# Altium PCB PCB_MACETA.PcbDoc
Units mil, origin at the board's own origin, x right, y up, seen from the top; angles counter-clockwise.
Board outline 2644 x 1425 mil, 2 copper layers (Top Layer, Bottom Layer); 33 components, 22 nets, 122 pads, 124 vias.
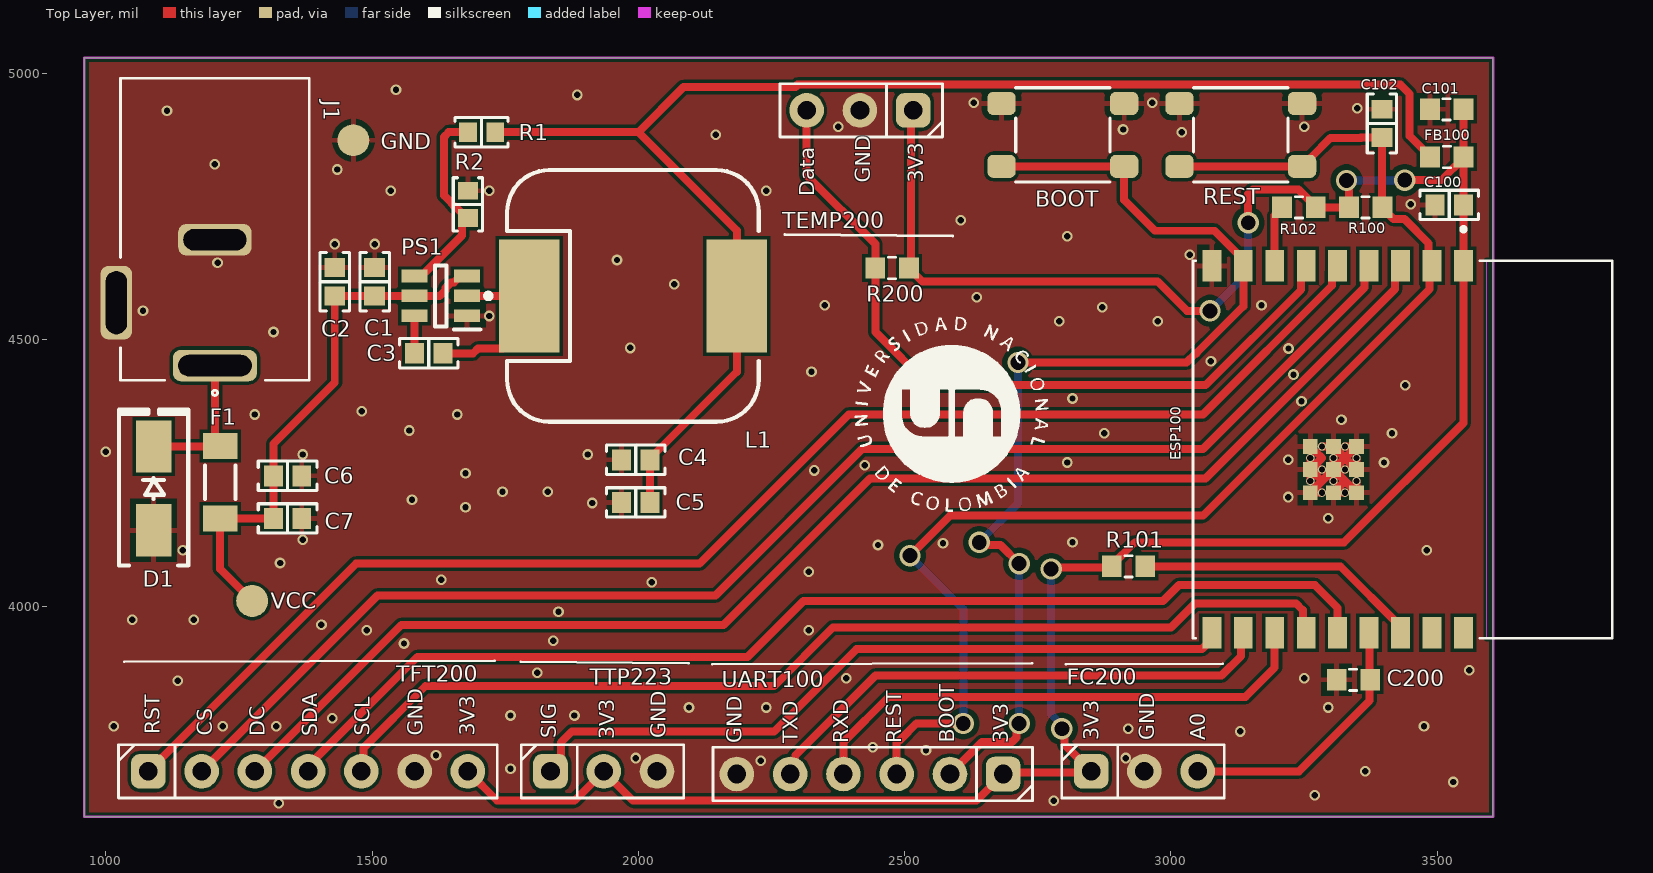
[diagram p0: Top Layer view]
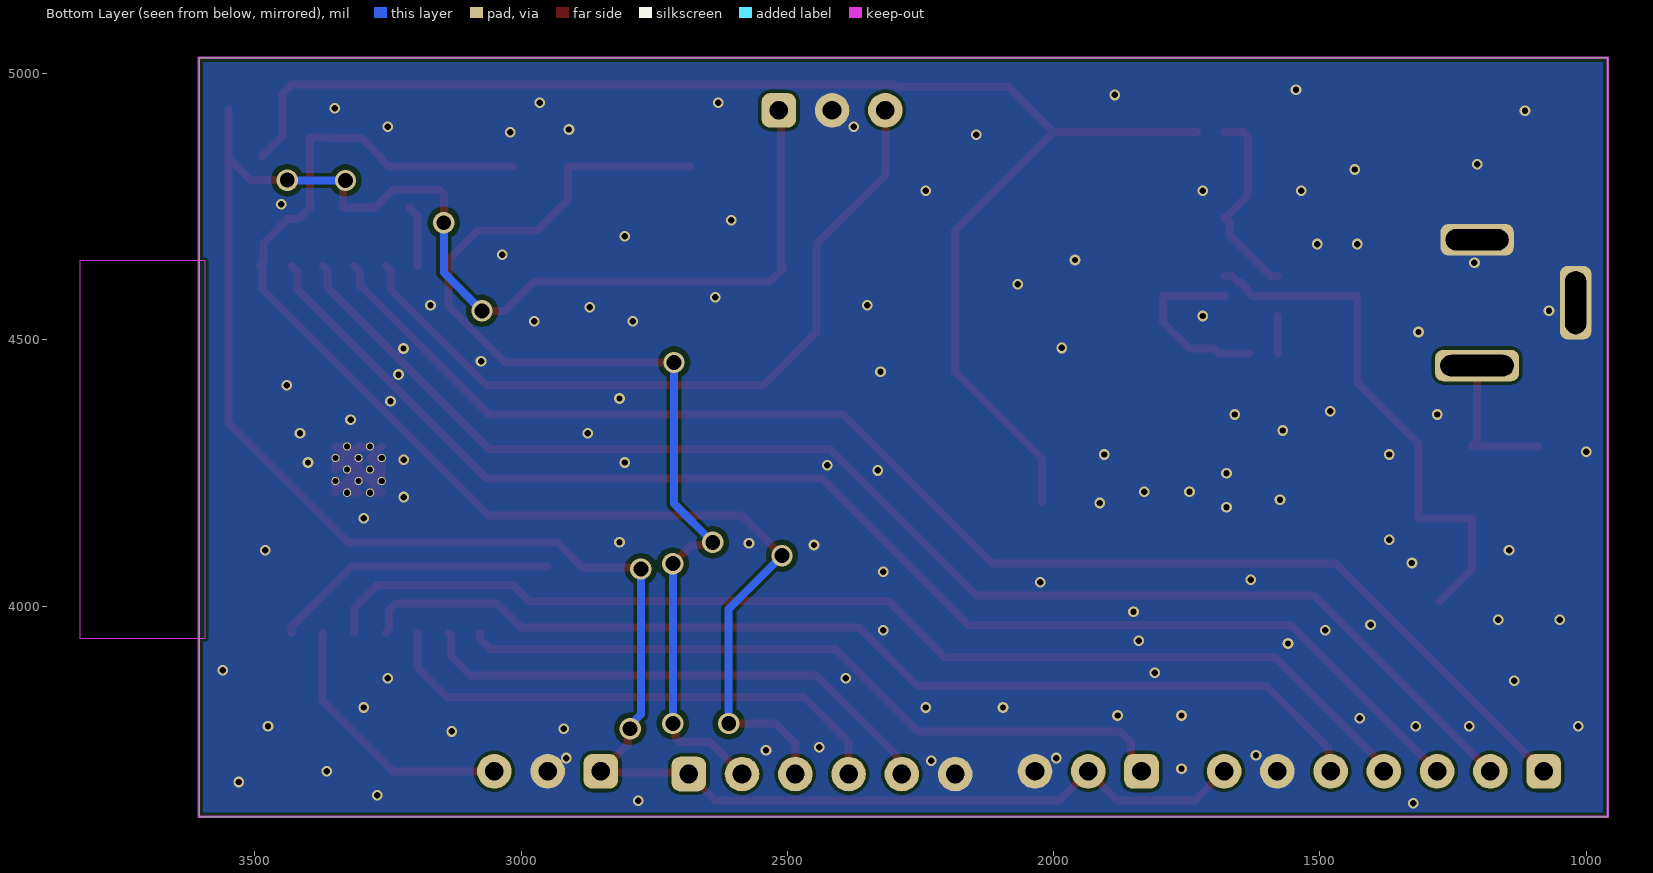
[diagram p1: Bottom Layer view, seen from below]
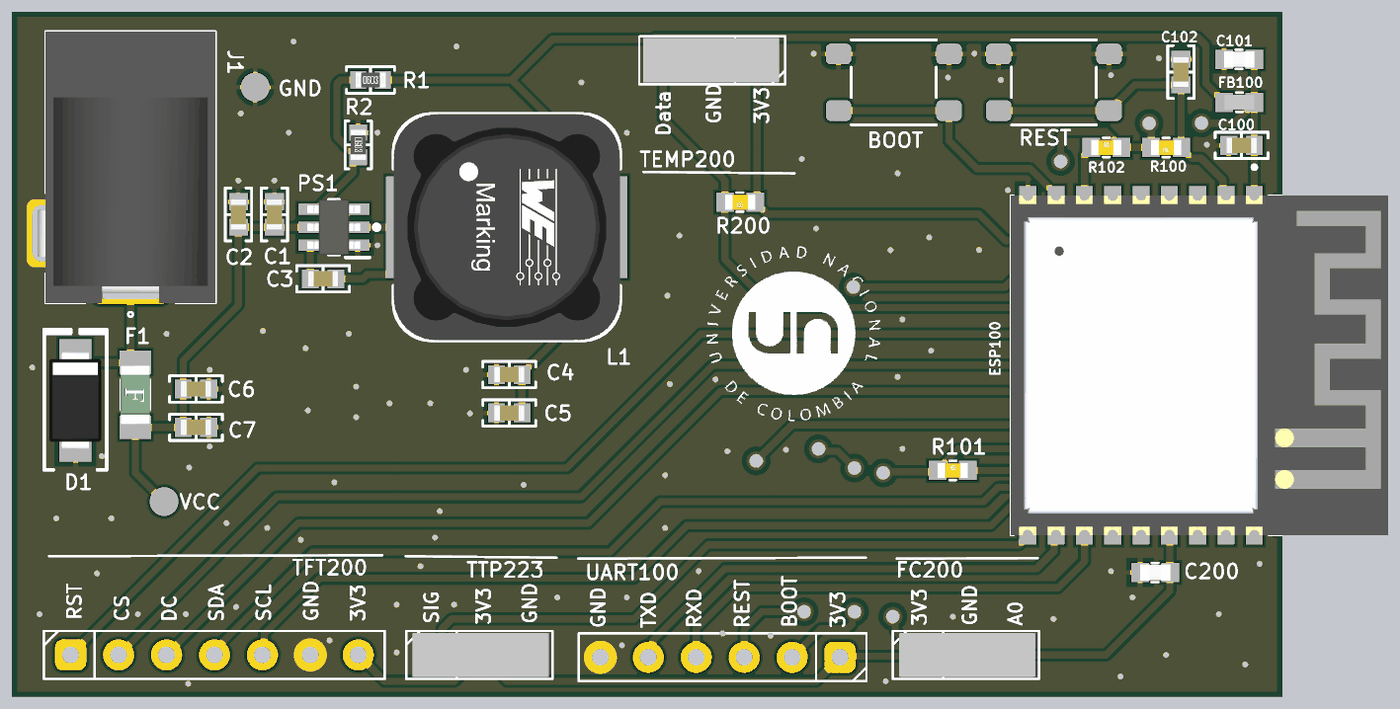
[diagram p2: 3D render of the assembled board from above, using the file's embedded part models]

## Layer stack, top to bottom
Top Solder: solder mask 0.4, Solder Resist, Dk 3.5
Top Layer: signal copper 1.4
Dielectric 1: dielectric 12.6, FR-4, Dk 4.8
Bottom Layer: signal copper 1.4
Bottom Solder: solder mask 0.4, Solder Resist, Dk 3.5

## Board outline
960,3605 3604,3605 3604,5030 960,5030

## Design rules (kind name [scope] priority, off if disabled: settings)
Clearance Clearance_Vias [IsVia] p1: gap=10 ignorepadtopadclearanceinfootprint=FALSE except(0: Arc-Hole Track-Hole SMDPad-Hole THPad-Hole Via-Hole Fill-Hole Poly-Hole Region-Hole Text-Hole)
Clearance [All] p2: gap=6 ignorepadtopadclearanceinfootprint=FALSE
HoleSize [All] p1: absolutevalues=TRUE maxlimit=200 minlimit=12 maxpercent=80.000 minpercent=20.000
MinimumAnnularRing [All] p1: minimumring=3
MinimumSolderMaskSliver [All] p1: minsoldermaskwidth=4
PolygonConnect PolygonConnect_3 [All vs IsNamedPolygon('GND_Top')] p1: thpad.connectstyle=Direct thpad.reliefconductorwidth=10 thpad.reliefentries=4 thpad.polygonreliefangle="90 Angle" thpad.airgapwidth=10 smdpad.connectstyle=Relief smdpad.reliefconductorwidth=10 smdpad.reliefentries=4 smdpad.polygonreliefangle="90 Angle" smdpad.airgapwidth=10 via.connectstyle=Direct via.reliefconductorwidth=10 via.reliefentries=4 via.polygonreliefangle="90 Angle" via.airgapwidth=10
PolygonConnect PolygonConnect_2 [All vs IsNamedPolygon('GND')] p2: connectstyle=Direct reliefconductorwidth=10 reliefentries=4 polygonreliefangle="90 Angle" airgapwidth=10
PolygonConnect GND [All vs IsNamedPolygon('GND_Top')] p3: thpad.connectstyle=Direct thpad.reliefconductorwidth=10 thpad.reliefentries=4 thpad.polygonreliefangle="90 Angle" thpad.airgapwidth=10 smdpad.connectstyle=Relief smdpad.reliefconductorwidth=10 smdpad.reliefentries=4 smdpad.polygonreliefangle="90 Angle" smdpad.airgapwidth=10 via.connectstyle=Direct via.reliefconductorwidth=10 via.reliefentries=4 via.polygonreliefangle="90 Angle" via.airgapwidth=10
PolygonConnect PolygonConnect_1 [All vs IsNamedPolygon('GND_Top')] p4: thpad.connectstyle=Direct thpad.reliefconductorwidth=10 thpad.reliefentries=4 thpad.polygonreliefangle="90 Angle" thpad.airgapwidth=10 smdpad.connectstyle=Relief smdpad.reliefconductorwidth=10 smdpad.reliefentries=4 smdpad.polygonreliefangle="90 Angle" smdpad.airgapwidth=10 via.connectstyle=Relief via.reliefconductorwidth=10 via.reliefentries=4 via.polygonreliefangle="90 Angle" via.airgapwidth=10
PolygonConnect [All] p5: connectstyle=Direct reliefconductorwidth=8 reliefentries=4 polygonreliefangle="90 Angle" airgapwidth=6
RoomDefinition ESP32 [InComponentClass('ESP32')] p1: confinementstyle=ConfineIn formatcopy=TRUE lockcomponents=FALSE outline 0,0 2000,0 2000,1000 0,1000
RoomDefinition Designator [InComponentClass('Designator')] p2: confinementstyle=ConfineIn formatcopy=TRUE lockcomponents=FALSE outline 0,0 2000,0 2000,1000 0,1000
RoutingVias [All] p1: holewidth=12 width=22 viastyle="Through Hole" minholewidth=12 minwidth=18 maxholewidth=30 maxwidth=40
SilkToSilkClearance [All] p1: silktosilkclearance=2
SilkToSolderMaskClearance [IsPad] p1: minsilkscreentomaskgap=0.1 clearancetoexposedcopper=TRUE
SolderMaskExpansion SolderMaskExpansion_Vias [IsVia] p1: expansion=2 istentingtop=TRUE
SolderMaskExpansion [All] p2: expansion=2 istentingtop=FALSE
Width [All] p1: maxlimit=100 minlimit=6 preferedwidth=10
26 further rules are at their usual default settings.

## Classes and differential pairs
component class POWER: C1 C2 C3 C4 C5 D1 F1 J1 L1 PS1 R1 R2 VCC vcc
component class ESP32: BOOT C100 C101 C102 ESP100 FB100 R100 R101 R102 REST UART100
component class Designator: C200 FC200 R200 TEMP200 TFT200 TTP223

## Components (designator, comment, footprint, x,y, rotation, side; value= is the part's Value field where it differs from the comment)
BOOT "Sw" Sw_PUSH_4.5x4.5x5mm 2797,4885 r180 top (schematic designator SW100)
C1 "4.7 µF" "CAP 0603_1608" 1505,4609.17 r270 top
C2 "0.1 µF" "CAP 0603_1608" 1430,4609.17 r270 top
C3 "0.1 µF" "CAP 0603_1608" 1606.57,4475 r180 top
C4 "22 µF" "CAP 0603_1608" 1995,4275 r0 top
C5 "22 µF" "CAP 0603_1608" 1995,4195 r0 top
C6 "0.1 µF" "CAP 0603_1608" 1341.57,4245 r180 top
C7 "10 µF" "CAP 0603_1608" 1341.57,4165 r180 top
C100 "10 µF" "CAP 0603_1608" 3522.52,4753.39 r0 top
C101 "0.1uF 50V" 0603_cap#1 3517.59,4933 r180 top value=0.1uF
C102 "1 µF" "CAP 0603_1608" 3396,4906.43 r270 top
C200 "0.1uF 50V" 0603_cap#2 3342.5,3862 r180 top value=0.1uF
D1 "SMAJ5.0A" "DO214AC SMA" 1090,4221.26 r90 top
ESP100 "ESP32-C3-WROOM-02-N4" ESP32-C3-WROOM-02-N4 3312.87,4294.49 r270 top
F1 "MFU1206FF05000P100" "FUSE 1206_3216 0.6MM" 1215,4232.91 r270 top
FB100 "60OHM 2A" 0603_fb 3517.59,4843.35 r0 top value="60 OHM"
FC200 "3x1" H_3X1_TH_100mil 2950,3690 r0 top
GND "GND" Pad_SMD 1465,4875 r90 top (schematic designator TP2)
J1 "PWR JACK 2.1mm" CON_POWER_BARREL_2.1MM_3CONN 1205,4570 r180 top
L1 "5.6 µH" "WURTH WE-PD 1280" 1989.88,4582.6 r0 top (schematic designator L?)
PS1 "LMR51430XDDCR" SOT95P280X110-6N 1629.21,4582.6 r180 top
R1 "100 kOhms" "RES 0603_1608" 1705.59,4890 r0 top
R2 "22.1 kOhms" "RES 0603_1608" 1680,4754.41 r270 top
R100 "10k 1/10W" 0603_res 3365.5,4749 r180 top value=10k
R101 "10k 1/10W" 0603_res 2920,4075 r0 top value=10k
R102 "10k 1/10W" 0603_res 3240,4749 r0 top value=10k
R200 "4k7 1/10W" 0603_res 2476.5,4635 r180 top value=4k7
REST "Sw" Sw_PUSH_4.5x4.5x5mm 3131,4885 r180 top (schematic designator SW101)
TEMP200 "3x1" H_3X1_TH_100mil 2416,4931 r180 top
TFT200 "7x1" H_7x1_TH_100mil 1380,3690 r0 top
TTP223 "3x1" H_3X1_TH_100mil 1935,3690 r0 top
UART100 "6x1" H_6x1_TH_100mil 2435,3685 r180 top
VCC "5V" Pad_SMD 1275,4010 r0 top (schematic designator TP1)

## Footprints (in the part's own frame and the unit in brackets; to place one, negate y for a bottom-side part, rotate by r counter-clockwise, add the part's x,y. Pads: shape width x height; smd on the part's side, far side on the other; paste and mask are expansions set on the pad)
0603_cap#1 [mil]
  rect 37x40 smd: 2(-31.5,0) 2(31.5,0)
  silkscreen extent -7,-20 8,20, body extent -31,-17 31,17, height 34
0603_cap#2 [mil]
  rect 37x40 smd: 1(-31.5,0) 2(31.5,0)
  silkscreen extent -7,-20 8,20, body extent -31,-17 31,17, height 34
0603_fb [mil]
  rect 37x40 smd: 1(-31.5,0) 2(31.5,0)
  silkscreen extent -6,-20 8,20, body extent -32,-16 31,16, height 32
0603_res [mil] "1608 Metric / 20190225 / C-A.Serna.A"
  rect 37x40 smd: 1(-31.5,0) 2(31.5,0)
  silkscreen extent -7,-20 8,20, body extent -31,-16 32,16, height 12
"CAP 0603_1608" [mm] "Chip Capacitor, 2-Leads, Body 1.60x0.80mm, IPC Medium Density"
  rect 0.9x1 smd: 1(-0.675,0) 2(0.675,0)
  silkscreen extent -1.4,-0.7 1.4,0.7, body extent -0.8,-0.41 0.8,0.41, height 0.82
CON_POWER_BARREL_2.1MM_3CONN [mm]
  rrect50% 4x1.5 hole 1.016 slot 3.5 at 0 deg: 1(0,3)
  rrect50% 3.5x1.5 hole 1.016 slot 3 at 0 deg: 2(0,-3)
  rrect50% 1.5x3.5 hole 1.016 slot 3 at 90 deg: 3(4.7,0)
  silkscreen extent -4.5,-10.7 4.5,4.42, body extent -4.5,-10.7 4.9,3.7, height 11
"DO214AC SMA" [mm] "Molded Diode, 2-Leads, Body 4.30x2.60mm, IPC Medium Density"
  rect 2.5x1.7 smd: 1(-2,0) 2(2,0)
  silkscreen extent -3.68,-1.65 3.75,1.65, body extent -2.6,-1.37 2.6,1.37, height 2.4
ESP32-C3-WROOM-02-N4 [mm]
  rect 1.5x0.9 smd: 1(-8.75,6) 2(-8.75,4.5) 3(-8.75,3) 4(-8.75,1.5) 5(-8.75,0) 6(-8.75,-1.5) 7(-8.75,-3) 8(-8.75,-4.5) 9(-8.75,-6) 10(8.75,-6) 11(8.75,-4.5) 12(8.75,-3) 13(8.75,-1.5) 14(8.75,0) 15(8.75,1.5) 16(8.75,3) 17(8.75,4.5) 18(8.75,6)
  rect 0.7x0.7 smd: 19(-0.14,0.9) 19(-0.14,-0.2) 19(-0.14,-1.3) 19(0.96,0.9) 19(0.96,-0.2) 19(0.96,-1.3) 19(2.06,-0.2) 19(2.06,0.9) 19(2.06,-1.3)
  round 0.4 hole 0.3 mask+0: 19(-0.14,0.35) 19(-0.14,-0.75) 19(0.41,0.9) 19(0.41,-0.2) 19(0.41,-1.3) 19(0.96,0.35) 19(0.96,-0.75) 19(1.51,0.9) 19(1.51,-0.2) 19(1.51,-1.3) 19(2.06,-0.75) 19(2.06,0.35)
  Keep-Out Layer region: 9,7.1 -9,7.1 -9,13.1 9,13.1
  Keep-Out Layer region: 9,7.1 -9,7.1 -9,13.1 9,13.1
  silkscreen extent -10.6,-6.9 9,13.1, body extent -9,-6.9 9,13.1, height 3.35
"FUSE 1206_3216 0.6MM" [mm] "Chip Fuse 1.5A AC 63V DC, 2-Leads, Body 3.10x1.55mm, IPC Medium Densitym"
  rect 1.25x1.65 smd: 1(-1.725,0) 2(1.725,0)
  silkscreen extent -0.8,-0.72 0.8,0.72, body extent -1.55,-0.77 1.55,0.78, height 0.76
H_3X1_TH_100mil [mil]
  rrect50% 65x65 hole 35: 1(-100,0)
  round 65 hole 35: 2(0,0) 3(100,0)
  silkscreen extent -155,-50 150,50, body extent -142,-46 142,46, height 320
H_6x1_TH_100mil [mil]
  rrect50% 65x65 hole 35: 1(-250,0)
  round 65 hole 35: 2(-150,0) 3(-50,0) 4(50,0) 5(150,0) 6(250,0)
  silkscreen extent -305,-50 295,50
H_7x1_TH_100mil [mil]
  rrect50% 65x65 hole 35: 1(-300,0)
  round 65 hole 35: 2(-200,0) 3(-100,0) 4(0,0) 5(100,0) 6(200,0) 7(300,0)
  silkscreen extent -356,-50 355,50
Pad_SMD [mil]
  round 60 smd: 2(0,0)
"RES 0603_1608" [mm] "Chip Resistor, 2-Leads, Body 1.60x0.80mm, IPC Medium Density"
  rect 0.85x0.95 smd: 1(-0.65,0) 2(0.65,0)
  silkscreen extent -1.27,-0.7 1.27,0.7, body extent -0.8,-0.4 0.8,0.4, height 0.45
SOT95P280X110-6N [mm]
  rect 1.25x0.6 smd: 1(-1.25,0.95) 2(-1.25,0) 3(-1.25,-0.95) 4(1.25,-0.95) 5(1.25,0) 6(1.25,0.95)
  silkscreen extent -1.88,-1.45 0.28,1.6, body extent -1.4,-1.45 1.4,1.45, height 0.97
Sw_PUSH_4.5x4.5x5mm [mm]
  rrect50% 1.35x1.1 smd: 1(-2.925,1.5) 1(2.925,1.5) 2(-2.925,-1.5) 2(2.925,-1.5)
  silkscreen extent -2.25,-2.25 2.25,2.25, body extent -2.25,-2.25 2.25,2.25, height 5
"WURTH WE-PD 1280" [mm] "SMT Shielded Power Inductor, 2-leads, body 12x12mm"
  rect 2.9x5.4 smd: 1(-4.95,0) 2(4.95,0)
  silkscreen extent -7.02,-6 6,6, body extent -6,-6 6,6, height 7.51

## Part data
BOOT REST: library part Sw_PUSH_4.5x4.5x5.0xmm, "SWITCH TACTILE SPST-NO 0.05A 12V", Manufacturer=BZCN, Manufacturer Part Number=TSC015A05026A, Supplier Part Number 1=C2888509, ComponentLink1Description=LCSC, ComponentLink1URL=https://www.lcsc.com/product-detail/Tactile-Switches_BZCN-TSC015A05026A_C2888509.html, Last modified by=N-A.Potosi, Last modified date=20190222, Supplier 1=LCSC
C1: library part 06033D475KAT2A, "CAP CER 4.7UF 25V X5R 0603", Device Package="0603 (1608 Metric)", Manufacturer="KYOCERA AVX", Operating Temperature="-55°C ~ 85°C", Supplier Part Number 1=478-KGM15CR51E475KTCT-ND, Temperature Coefficient=X5R, Tolerance=±10%, Voltage - Rated=25V, Applications="General Purpose", Capacitance="4.7 µF", ComponentLink1Description=Datasheet, ComponentLink1URL=https://datasheets.kyocera-avx.com/cx5r.pdf, componentlink2description="DigiKey Link", componentlink2url=https://www.digikey.com/en/products/detail/kyocera-avx/06033D475KAT2A/10815061, lastupdated="6/04/2026 7:22:31 p. m.", Lifecycle Status=Active, Minimum Order=1, Mounting Type="Surface Mount, MLCC", Package / Case="0603 (1608 Metric)", packaging=TapeAndReel, Part Number=06033D475KAT2A, Part Status=Active, partid=35784, price=0.09, series="KGM - X5R", Size / Dimension="0.063\" L x 0.031\" W (1.60mm x 0.80mm)", Supplier 1=DigiKey, Thickness (Max)="0.039\" (1.00mm)"
C2 C3 C6: library part CL10E104KC8VPNC, "CAP CER 100NF 100V X8L 0603", Device Package="0603 (1608 Metric)", Manufacturer="Samsung Electro-Mechanics", Operating Temperature="-55°C ~ 150°C", Ratings=AEC-Q200, Supplier Part Number 1=1276-CL10E104KC8VPNCCT-ND, Temperature Coefficient=X8L, Tolerance=±10%, Voltage - Rated=100V, Applications=Automotive, Capacitance="0.1 µF", ComponentLink1Description=Datasheet, ComponentLink1URL=https://mm.digikey.com/Volume0/opasdata/d220001/medias/docus/5458/CL10E104KC8VPNC_Spec.pdf, componentlink2description="DigiKey Link", componentlink2url=https://www.digikey.com/en/products/detail/samsung-electro-mechanics/CL10E104KC8VPNC/20498486, Features="General Purpose", lastupdated="6/04/2026 7:18:46 p. m.", Lifecycle Status=Active, Minimum Order=1, Mounting Type="Surface Mount, MLCC, Epoxy", Package / Case="0603 (1608 Metric)", packaging=TapeAndReel, Part Number=CL10E104KC8VPNC, partid=68845, price=0.04, series=CL, Size / Dimension="0.063\" L x 0.031\" W (1.60mm x 0.80mm)", Supplier 1=DigiKey, Thickness (Max)="0.035\" (0.88mm)"
C4 C5: library part 0603YD226MAT2A, "CAP CER 22UF 16V X5R 0603", Device Package="0603 (1608 Metric)", Manufacturer="KYOCERA AVX", Operating Temperature="-55°C ~ 85°C", Supplier Part Number 1=478-KGM15CR51C226MTCT-ND, Temperature Coefficient=X5R, Tolerance=±20%, Voltage - Rated=16V, Applications="General Purpose", Capacitance="22 µF", ComponentLink1Description=Datasheet, ComponentLink1URL=https://datasheets.kyocera-avx.com/cx5r-KGM.pdf, componentlink2description="DigiKey Link", componentlink2url=https://www.digikey.com/en/products/detail/kyocera-avx/0603YD226MAT2A/17866383, lastupdated="6/04/2026 7:18:42 p. m.", Lifecycle Status=Active, Minimum Order=1, Mounting Type="Surface Mount, MLCC", Package / Case="0603 (1608 Metric)", packaging=TapeAndReel, Part Number=0603YD226MAT2A, partid=68615, price=0.11, series="KGM - X5R", Size / Dimension="0.063\" L x 0.031\" W (1.60mm x 0.80mm)", Supplier 1=DigiKey, Thickness (Max)="0.039\" (1.00mm)"
C7: library part 0603X106M100CT, "CAP CER 10UF 10V X5R 0603", Device Package="0603 (1608 Metric)", Manufacturer="Walsin Technology Corporation", Operating Temperature="-55°C ~ 85°C", Supplier Part Number 1=1292-0603X106M100CT-ND, Temperature Coefficient=X5R, Tolerance=±20%, Voltage - Rated=10V, Applications="General Purpose", Capacitance="10 µF", ComponentLink1Description=Datasheet, ComponentLink1URL=https://www.passivecomponent.com/wp-content/uploads/datasheet/WTC_MLCC_General_Purpose.pdf, componentlink2description="DigiKey Link", componentlink2url=https://www.digikey.com/en/products/detail/walsin-technology-corporation/0603X106M100CT/15983159, lastupdated="6/04/2026 7:17:37 p. m.", Lifecycle Status=Active, Minimum Order=1, Mounting Type="Surface Mount, MLCC", Package / Case="0603 (1608 Metric)", packaging=TapeAndReel, Part Number=0603X106M100CT, partid=64846, price=0.01, series=-, Size / Dimension="0.063\" L x 0.031\" W (1.60mm x 0.80mm)", Supplier 1=DigiKey, Thickness (Max)="0.037\" (0.95mm)"
C100: library part 06033D106KAT2A, "CAP CER 10UF 25V X5R 0603", Device Package="0603 (1608 Metric)", Manufacturer="KYOCERA AVX", Operating Temperature="-55°C ~ 85°C", Supplier Part Number 1=478-KGM15CR51E106KTCT-ND, Temperature Coefficient=X5R, Tolerance=±10%, Voltage - Rated=25V, Applications="General Purpose", Capacitance="10 µF", ComponentLink1Description=Datasheet, ComponentLink1URL=https://datasheets.kyocera-avx.com/cx5r-KGM.pdf, componentlink2description="DigiKey Link", componentlink2url=https://www.digikey.com/en/products/detail/kyocera-avx/06033D106KAT2A/17866340, lastupdated="6/04/2026 7:18:42 p. m.", Lifecycle Status=Active, Minimum Order=1, Mounting Type="Surface Mount, MLCC", Package / Case="0603 (1608 Metric)", packaging=TapeAndReel, Part Number=06033D106KAT2A, partid=68623, price=0.08, series="KGM - X5R", Size / Dimension="0.063\" L x 0.031\" W (1.60mm x 0.80mm)", Supplier 1=DigiKey, Thickness (Max)="0.039\" (1.00mm)"
C101 C200: library part Cap_0.1uF_0603_50V, "50V 100nF Y5V -20%~+80% 0603 Multilayer Ceramic Capacitors MLCC - SMD/SMT ROHS", Manufacturer="Walsin Tech Corp", Manufacturer Part Number=0603F104Z500CT, Supplier Part Number 1=C83060, ComponentLink1Description=LCSC, ComponentLink1URL=https://www.lcsc.com/product-detail/Multilayer-Ceramic-Capacitors-MLCC-SMD-SMT_Walsin-Tech-Corp-0603F104Z500CT_C83060.html, Supplier 1=LCSC
C102: library part 0603B105K250CT, "CAP CER 1UF 25V X7R 0603", Device Package="0603 (1608 Metric)", Manufacturer="Walsin Technology Corporation", Operating Temperature="-55°C ~ 125°C", Supplier Part Number 1=1292-0603B105K250CT-ND, Temperature Coefficient=X7R, Tolerance=±10%, Voltage - Rated=25V, Applications="General Purpose", Capacitance="1 µF", ComponentLink1Description=Datasheet, ComponentLink1URL=https://www.passivecomponent.com/wp-content/uploads/datasheet/WTC_MLCC_General_Purpose.pdf, componentlink2description="DigiKey Link", componentlink2url=https://www.digikey.com/en/products/detail/walsin-technology-corporation/0603B105K250CT/14836817, lastupdated="6/04/2026 7:22:13 p. m.", Lifecycle Status=Active, Minimum Order=1, Mounting Type="Surface Mount, MLCC", Package / Case="0603 (1608 Metric)", packaging=TapeAndReel, Part Number=0603B105K250CT, Part Status=Active, partid=41189, price=0.01, series=-, Size / Dimension="0.063\" L x 0.031\" W (1.60mm x 0.80mm)", Supplier 1=DigiKey, Thickness (Max)="0.037\" (0.95mm)"
D1: "TVS DIODE 5VWM 9.2VC DO214AC", Current - Peak Pulse (10/1000µs)=43.5A, Manufacturer="Littelfuse Inc.", Operating Temperature="-65°C ~ 150°C (TJ)", Package / Case="DO-214AC, SMA", Power - Peak Pulse=400W, Power Line Protection=No, Supplier Device Package="DO-214AC (SMA)", Supplier Part Number 1=SMAJ5.0ALFCT-ND, Voltage - Breakdown (Min)=6.4V, Voltage - Clamping (Max) @ Ipp=9.2V, Voltage - Reverse Standoff (Typ)=5V, Applications="General Purpose", ComponentLink1Description=Datasheet, ComponentLink1URL=https://www.littelfuse.com/~/media/electronics/datasheets/tvs_diodes/littelfuse_tvs_diode_smaj_datasheet.pdf.pdf, componentlink2description="DigiKey Link", componentlink2url=https://www.digikey.com/en/products/detail/littelfuse-inc/SMAJ5-0A/762250, lastupdated="5/04/2026 8:34:16 p. m.", Lifecycle Status=Active, Minimum Order=1, Mounting Type="Surface Mount", packaging=TapeAndReel, Part Number=SMAJ5.0A, Part Status=Active, partid=5719, price=0.06, series=SMAJ, Supplier 1=DigiKey, Type=Zener, Unidirectional Channels=1
ESP100: library part MCU_ESP32-C3-WROOM-02-N4, "RF TXRX MOD BT WIFI PCB TH SMD", Manufacturer="Espressif Systems", Supplier Part Number 1=C2934560, ComponentLink1Description=LCSC, ComponentLink1URL=https://lcsc.com/product-detail/WiFi-Modules_Espressif-Systems-ESP32-C3-WROOM-02-N4_C2934560.html, Manufacturer Part Number=ESP32-C3-WROOM-02-N4, Supplier 1=LCSC
F1: "FUSE BOARD MOUNT 5A 63VDC 1206", Breaking Capacity @ Rated Voltage=50A, Current Rating (Amps)=5A, Device Package="1206 (3216 Metric)", Manufacturer="Vishay Beyschlag", Operating Temperature="-55°C ~ 125°C", Supplier Part Number 1=MFU12065.00CT-ND, Voltage Rating - DC=63V, Approval Agency=UL, Approvals=UL, ComponentLink1Description=Datasheet, ComponentLink1URL=http://www.vishay.com/docs/28747/mfuserie.pdf, componentlink2description="DigiKey Link", componentlink2url=http://digikey.com/product-detail/en/vishay-beyschlag/MFU1206FF05000P100/MFU12065.00CT-ND/1206572, Fuse Type="Board Mount (Cartridge Style Excluded)", lastupdated="2/09/2020 1:30:46 a. m.", Lifecycle Status=Active, Melting I²t=0.2275, Minimum Order=1, Mounting Type="Surface Mount", Package / Case="1206 (3216 Metric)", packaging=TapeAndReel, Part Number=MFU1206FF05000P100, Part Status=Active, price=0.30, Response Time="Fast Blow", series=MFU, Size / Dimension="0.126\" L x 0.063\" W x 0.022\" H (3.20mm x 1.60mm x 0.55mm)", Supplier 1=DigiKey
FB100: library part FB_60_0603_2A, "2A 1 100mΩ 60Ω@100MHz ±25% 0603 Ferrite Beads ROHS", Manufacturer=TAI-TECH, Manufacturer Part Number=HCB1608KF-600T20, Supplier Part Number 1=C369516, ComponentLink1Description=LCSC, ComponentLink1URL=https://www.lcsc.com/product-detail/Ferrite-Beads_TAI-TECH-HCB1608KF-600T20_C369516.html, Supplier 1=LCSC
FC200 TEMP200 TTP223: library part H_Male_3x1_TH_100mil, "H_Male_3x1_TH_100mil", ComponentLink1Description=LCSC
GND VCC: library part Test, "Test1.5mm"
J1: library part Con_Power_Jack_2.1mm_3pins, "CONN PWR JACK 2X5.5MM SOLDER", Manufacturer=HCTL, Manufacturer Part Number=HC-DC-005-2.0T, Supplier Part Number 1=C3010533, ComponentLink1Description=LCSC, ComponentLink1URL=https://www.lcsc.com/product-detail/AC-DC-Power-Connectors_HCTL-HC-DC-005-2-0T_C3010533.html, Supplier 1=LCSC
L1: library part 74477005, "FIXED IND 5.6UH 8A 17 MOHM SMD", Current - Saturation=8.2A, Current Rating (Amps)="8 A", DC Resistance (DCR)="17mOhm Max", Device Package=Nonstandard, Frequency - Self Resonant=24MHz, Inductance Frequency - Test="1 kHz", Manufacturer="Würth Elektronik", Operating Temperature="-40°C ~ 125°C", Ratings=AEC-Q200, Supplier Part Number 1=732-13489-1-ND, Tolerance="-20%, +40%", componentlink2description="DigiKey Link", componentlink2url=https://www.digikey.com/en/products/detail/würth-elektronik/74477005/9859283, Height - Seated (Max)="0.315\" (8.00mm)", Inductance="5.6 µH", lastupdated="5/04/2026 9:05:06 p. m.", Lifecycle Status=Active, Material - Core=Ferrite, Minimum Order=1, Mounting Type="Surface Mount", Package / Case=Nonstandard, packaging=TapeAndReel, Part Number=74477005, Part Status=Active, partid=5767, price=1.20, series=WE-PD, Shielding=Shielded, Size / Dimension="0.472\" L x 0.472\" W (12.00mm x 12.00mm)", Supplier 1=DigiKey, Type="Drum Core, Wirewound"
PS1: "Power Supply", Manufacturer_Name="Texas Instruments", Mouser Part Number=595-LMR51430XDDCR, Arrow Part Number=LMR51430XDDCR, Arrow Price/Stock=https://www.arrow.com/en/products/lmr51430xddcr/texas-instruments.html?utm_currency=USD&region=asia, Datasheet Link=https://www.ti.com/lit/ds/symlink/lmr51430.pdf?HQS=dis-mous-null-mousermode-dsf-pf-null-wwe&ts=1665567212982&ref_url=https%253A%252F%252Fwww.mouser.co.uk%252F, Height=1.1mm, Manufacturer_Part_Number=LMR51430XDDCR, Mouser Price/Stock=https://www.mouser.co.uk/ProductDetail/Texas-Instruments/LMR51430XDDCR?qs=vvQtp7zwQdP8miJIr5Aupg%3D%3D
R1: library part AA0603FR-07100KL, "RES SMD 100K OHM 1% 1/10W 0603", Device Package="0603 (1608 Metric)", Manufacturer=Yageo, Operating Temperature="-55°C ~ 155°C", Power (Watts)="0.1W, 1/10W", Ratings=AEC-Q200, Supplier Device Package=0603, Supplier Part Number 1=13-AA0603FR-07100KLCT-ND, Temperature Coefficient=±150ppm/°C, Tolerance=±1%, ComponentLink1Description=Datasheet, ComponentLink1URL=https://www.yageo.com/upload/media/product/productsearch/datasheet/rchip/PYu-AA_51_RoHS_L_3.pdf, componentlink2description="DigiKey Link", componentlink2url=https://www.digikey.com/en/products/detail/yageo/AA0603FR-07100KL/5888687, Composition="Thick Film", Features="Anti-Sulfur, Automotive AEC-Q200, Moisture Resistant", Height - Seated (Max)="0.022\" (0.55mm)", lastupdated="6/04/2026 7:43:21 p. m.", Lifecycle Status=Active, Minimum Order=1, Number of Terminations=2, Package / Case="0603 (1608 Metric)", packaging=TapeAndReel, Part Number=AA0603FR-07100KL, partid=78895, price=0.01, Resistance="100 kOhms", series=AA, Size / Dimension="0.063\" L x 0.031\" W (1.60mm x 0.80mm)", Supplier 1=DigiKey
R2: library part AC0603FR-0722K1L, "RES SMD 22.1K OHM 1% 1/10W 0603", Device Package="0603 (1608 Metric)", Manufacturer=Yageo, Operating Temperature="-55°C ~ 155°C", Power (Watts)="0.1W, 1/10W", Ratings=AEC-Q200, Supplier Device Package=0603, Supplier Part Number 1=YAG5325CT-ND, Temperature Coefficient=±100ppm/°C, Tolerance=±1%, ComponentLink1Description=Datasheet, ComponentLink1URL=https://www.yageo.com/upload/media/product/productsearch/datasheet/rchip/PYu-AC_51_RoHS_L_7.pdf, componentlink2description="DigiKey Link", componentlink2url=https://www.digikey.com/en/products/detail/yageo/AC0603FR-0722K1L/5895923, Composition="Thick Film", Features="Automotive AEC-Q200, Moisture Resistant", Height - Seated (Max)="0.022\" (0.55mm)", lastupdated="6/04/2026 7:43:51 p. m.", Lifecycle Status=Active, Minimum Order=1, Number of Terminations=2, Package / Case="0603 (1608 Metric)", packaging=CutTape, Part Number=AC0603FR-0722K1L, Part Status=Active, partid=15830, price=0.01, Resistance="22.1 kOhms", series=AC, Size / Dimension="0.063\" L x 0.031\" W (1.60mm x 0.80mm)", Supplier 1=DigiKey
R100 R101 R102: library part Res_10k_0603_1/10W, "RES SMD 10k OHM 5% 1/10W 0603", Manufacturer=FOJAN, Manufacturer Part Number=FRC0603J103TS, Supplier Part Number 1=C2930027, ComponentLink1Description=LCSC, ComponentLink1URL=https://www.lcsc.com/product-detail/Chip-Resistor-Surface-Mount_FOJAN-FRC0603J103TS_C2930027.html, Supplier 1=LCSC
R200: library part Res_4k7_0603_1/10W, "100mW Thick Film Resistor 75V ±1% 4.7kΩ 0603 Chip Resistor - Surface Mount ROHS", Manufacturer=VO, Manufacturer Part Number=SCR0603F4K7, Supplier Part Number 1=C3016318, ComponentLink1Description=LCSC, ComponentLink1URL=https://lcsc.com/product-detail/Chip-Resistor-Surface-Mount_VO-SCR0603F4K7_C3016318.html, Supplier 1=LCSC
TFT200: library part H_Male_7x1_TH_100mil, "H_Male_7x1_TH_100mil", ComponentLink1Description=LCSC
UART100: library part H_Male_6x1_TH_100mil, "H_Male_6x1_TH_100mil", ComponentLink1Description=LCSC

## Via types
v1: diameter 20, hole 12, Top Layer to Bottom Layer, tented both sides, 112 vias
v2: diameter 40, hole 28, Top Layer to Bottom Layer, tented both sides, 12 vias

## Nets (pads, with @x,y where several pads share a name; then routed paths per layer and width w, separated by ;. In a path a pad name is that pad's centre, name@x,y a point inside that pad or via, vN(x,y) a via of type N, cw(c..) or ccw(c..) an arc to the next point about the centre after c; other vN are vias at no path point)
3.3V: C4.2 C5.2 FB100.1 L1.2 R1.2 | length 2734.5
  Top Layer w15: R1.2 2000,4890 ; C5.2 C4.2 2021.57,4276.97 2184.76,4440.16 L1.2 2184.76,4705.24 2000,4890 ; FB100.1 3486.09,4844.85 3448.19,4882.76 3448.19,4961.81 3430.79,4979.21 2299.16,4979.21 2294.95,4975 2085,4975 2000,4890
5V: C1.2 C2.2 C6.2 C7.2 F1.2 PS1.3 PS1.5 VCC.2 | length 1011.5
  Top Layer w15: VCC.2 1215,4070 F1.2 C7.2 C6.2 1315,4305 1430,4420 C2.2 C1.2 PS1.5 1627.11,4582.6 1637.67,4593.16 1637.67,4597.35 1648.23,4607.91 1653.54,4607.91 1665.63,4620 PS1.3
A0: C200.1 ESP100.15 FC200.3 | length 505.5
  Top Layer w15: FC200.3 3240,3690 3372.96,3822.96 3372.96,3948.96 ESP100.15
BOOT: BOOT.1 ESP100.8 UART100.2 | length 2059
  Top Layer w15: UART100.2 2645,3745 2701.43,3745 2710.22,3753.79 2710.22,3775.22 v2(2715,3780) ; v2(2640,4120) 2644.78,4115.22 2679.78,4115.22 v2(2715,4080) ; BOOT.1@2681.84,4825.94 2912.16,4825.94 2912.16,4762.84 2970,4705 3081.5,4705 3135.71,4650.79 3135.71,4563.21 3047.5,4475 3046.46,4475 3029.2,4457.73 v2(2712.68,4457.73)
  Bottom Layer w15: v2(2640,4120) 2712.68,4192.68 v2(2712.68,4457.73) ; v2(2715,3780) v2(2715,4080)
CS: ESP100.4 TFT200.2 | length 2603.8
  Top Layer w15: TFT200.2 1510,4020 2145,4020 2420,4295 3060,4295 3363.42,4598.42 3363.42,4630.47 ESP100.4
DC: ESP100.3 TFT200.3 | length 2563.4
  Top Layer w15: TFT200.3 1555,3965 2160,3965 2435,4240 3065,4240 3420.77,4595.77 3420.77,4628.76 ESP100.3
ESP_EN: C102.2 ESP100.2 R100.1 REST.1 UART100.3 | length 2481
  Top Layer w15: UART100.3 2485,3743.22 2493.79,3752.01 2521.78,3780 v2(2610,3780) ; v2(2510,4095) 2585,4170 3060,4170 3485.74,4595.74 3485.74,4634.67 ESP100.2 3483.5,4645.52 3483.5,4681.5 3438.21,4726.79 3417.71,4726.79 3397,4747.5 R100.1 3396,4749 3395,4750 3396.5,4751.5 3396.5,4879.35 C102.2 3357.03,4879.85 3356.66,4879.48 3299.7,4879.48 3263.18,4842.97 3263.18,4839.85 3249.28,4825.94 3246.16,4825.94 REST.1@3015.84,4825.94
  Bottom Layer w15: v2(2510,4095) 2610,3995 v2(2610,3780)
GND: BOOT.2 C1.1 C2.1 C4.1 C5.1 C6.1 C7.1 C100.1 C101.2@3486.09,4933 C102.1 C200.2 D1.1 ESP100.9 ESP100.19 FC200.2 GND.2 J1.2 J1.3 PS1.1 R2.1 REST.2 TEMP200.2 TFT200.6 TTP223.3 UART100.6 | length 627.3
  Top Layer w15: ESP100.19@3261.69,4235.04 ESP100.19@3261.69,4256.69 ; ESP100.19@3261.69,4278.35 ESP100.19@3261.69,4256.69 ; ESP100.19@3261.69,4300 3272.52,4289.17 3283.35,4278.35 ESP100.19@3261.69,4256.69 ; ESP100.19@3283.35,4213.39 3261.69,4213.39 3283.35,4235.04 ; ESP100.19@3283.35,4256.69 ESP100.19@3261.69,4256.69 ; ESP100.19@3283.35,4300 3305,4300 3326.65,4278.35 ; ESP100.19@3305,4235.04 ESP100.19@3305,4256.69 ; ESP100.19@3305,4278.35 ESP100.19@3305,4256.69 ; ESP100.19@3326.65,4213.39 3305,4213.39 3326.65,4235.04 ; ESP100.19@3326.65,4256.69 ESP100.19@3305,4256.69 ; ESP100.19@3326.65,4300 3348.31,4300 3342.03,4293.72 3326.65,4278.35 ; ESP100.19@3348.31,4235.04 3348.31,4213.39 3342.03,4219.67 3326.65,4235.04 ; ESP100.19@3348.31,4278.35 3348.31,4256.69 3326.65,4278.35 ; ESP100.19@3261.69,4256.69 3272.52,4245.87 3283.35,4235.04 ; 3283.35,4235.04 3298.72,4250.41 ESP100.19@3305,4256.69 ; ESP100.19@3305,4256.69 3326.65,4278.35 ; ESP100.19@3305,4256.69 3326.65,4235.04
  other v1: 1325,3630 2780,3635 3270,3645 3530,3670 3365,3690 1760,3695 2230,3710 1995,3715 2915,3715 1620,3720 2540,3730 2440,3735 3130,3765 2920,3770 1015,3775 1220,3775 1320,3775 3475,3775 1425,3790 1760,3795 1880,3795 2095,3810 2240,3810 3295,3810 1135,3860 2390,3865 3250,3865 1810,3875 3560,3880 1560,3930 1840,3935 1490,3955 2320,3955 1405,3965 1050,3975 1165,3975 1850,3990 2025,4045 1630,4050 2320,4065 1327.35,4081.15 1145,4105 3480,4105 2450,4115 2571.95,4118.05 2815,4120 1370,4125 3295,4165 1675.54,4186.07 1913.18,4193.92 1575,4200 3220,4205 1745,4215 1830,4215 1675.54,4249.7 2330,4255 2425,4265 2805,4270 3400,4270 3220,4275 1370,4285 1905,4285 1000,4290 2875,4325 3415,4325 1570,4330 3320,4350 1280,4360 1660,4360 1480.9,4366.09 3245,4385 2815,4390 3440,4415 3230,4435 2325,4440 3075,4460 3220.64,4484.03 1985,4485 1315,4515 2790,4535 2975,4535 1720,4545 1070,4555 2870.91,4561.4 2350,4565 3170,4565 2635,4580 2067.67,4604.77 1210,4645 1960,4650 3035,4660 1430,4680 1505,4680 2805,4695 2605,4725 3450,4755 1535,4780 1720,4780 2240,4780 1435,4820 1205,4830 2145,4885 3020,4890 2910,4895 2375,4900 3250,4900 1115,4930 3350,4935 2630,4945 2965,4945 1885,4960 1545,4970
NetC3_1: C3.1 L1.1 PS1.2 | length 351.8
  Top Layer w15: C3.1 1689.99,4475 1698.79,4483.8 1745.41,4483.8 1795,4533.39 L1.1 PS1.2
NetC3_2: C3.2 PS1.6 | length 70.2
  Top Layer w15: C3.2 PS1.6
NetD1_2: D1.2 F1.1 J1.1 | length 280.5
  Top Layer w15: D1.2 1214.17,4300 F1.1 1205,4310.83 J1.1
NetESP100_7: ESP100.7 R102.1 | length 115.7
  Top Layer w15: ESP100.7 3194.76,4733.76 3208.5,4747.5 R102.1
NetESP100_16: ESP100.16 R101.2 | length 538.2
  Top Layer w15: R101.2 3317.8,4075 3430.98,3961.81 ESP100.16
NetPS1_4: PS1.4 R1.1 R2.2 | length 378.2
  Top Layer w15: PS1.4 1592.8,4620 1668.8,4696 1668.8,4719.59 R2.2@1678.03,4728.82 ; R2.2 R2.2@1678.03,4728.82 ; R1.1 1644.01,4890 1635.23,4881.21 1635.23,4771.62 1647.8,4759.05 1647.8,4757.68 1655.71,4749.77 1657.08,4749.77 R2.2@1678.03,4728.82
RST: ESP100.5 TFT200.1 | length 2641.2
  Top Layer w15: TFT200.1 1470,4080 2115,4080 2395,4360 3060,4360 3302.66,4602.66 3302.66,4628.76 ESP100.5
RXD: ESP100.11 UART100.5 | length 998.1
  Top Layer w15: UART100.5 2294.57,3694.57 2294.57,3719.57 2445,3870 3095,3870 3131.76,3906.76 3131.76,3946.05 ESP100.11
SCL: ESP100.13 TFT200.5 | length 1971.7
  Top Layer w15: TFT200.5 1483.89,3693.89 1483.89,3733.89 1600,3850 2255,3850 2365,3960 3000,3960 3045,4005 3235,4005 3247.38,3992.62 3247.38,3956.44 ESP100.13
SDA: ESP100.14 TFT200.4 | length 2148.6
  Top Layer w15: TFT200.4 1380,3700 1585,3905 2205,3905 2310,4010 2985,4010 3015,4040 3270,4040 3312.87,3997.13 ESP100.14
SIG: ESP100.10 TTP223.1 | length 1376.8
  Top Layer w15: TTP223.1 1854.6,3709.6 1854.6,3744.6 1875,3765 2255,3765 2410,3920 3058.46,3920 3076.65,3938.19 ESP100.10
TEMP_DATA: ESP100.6 R200.2 TEMP200.3 | length 1433
  Top Layer w15: TEMP200.3 2316,4809 2445,4680 R200.2 2445,4595 2445.1,4594.9 2445.1,4514.9 2545,4415 3065,4415 3244.37,4594.37 3244.37,4629.52 ESP100.6
TXD: ESP100.12 UART100.4 | length 992.9
  Top Layer w15: UART100.4 2385,3745 2470,3830 3140,3830 3194.76,3884.76 ESP100.12
V_ESP: C100.2 C101.2@3549.09,4933 ESP100.1 FB100.2 FC200.1 R100.2 R101.1 R102.2 R200.1 TEMP200.1 TFT200.7 TTP223.2 UART100.1 | length 4794
  Top Layer w15: TFT200.7 1735,3635 1880,3635 TTP223.2 ; TTP223.2@1934.43,3689.09 1935.91,3689.09 1990,3635 2635,3635 UART100.1 2687.5,3687.5 2847.5,3687.5 FC200.1 2799.78,3740.22 2799.78,3765.22 v2(2795,3770) ; TEMP200.1 2512,4927 2512,4639 R200.1 2508,4633.5 2519,4622.5 2520.5,4622.5 2533,4610 2975,4610 3030.45,4554.55 v2(3073.1,4554.55) ; v2(2775,4070) 2777.5,4072.5 2886,4072.5 R101.1 2888.5,4076.5 2932,4120 3325,4120 3549.09,4344.09 ESP100.1 C100.2 FB100.2@3549.09,4841.85 ; v2(3145,4720) 3145,4773.71 3153.79,4782.5 3239.5,4782.5 3271.5,4750.5 R102.2 R100.2 3334,4795.03 v2(3329.62,4799.41) ; v2(3438.86,4799.98) 3507.23,4799.98 FB100.2@3549.09,4841.85 ; C101.2@3549.09,4933 FB100.2 FB100.2@3549.09,4841.85
  Bottom Layer w15: v2(2775,4070) 2775,3796.76 2795,3776.76 v2(2795,3770) ; v2(3073.1,4554.55) 3145,4626.45 v2(3145,4720) ; v2(3329.62,4799.41) 3438.29,4799.41 v2(3438.86,4799.98)
pads on no net: ESP100.17 ESP100.18

## Polygon pours and split planes (outlines as drawn)
GND on Top Layer "GND_Top" (solid, remove dead copper, pour order 0): 960,3605 3605,3605 3604,5030 960,5030
GND on Bottom Layer "GND_BOOT" (solid, remove dead copper, pour order 4): 960,3605 3604,3605 3604,5030 960,5030

## Keep-outs
Keep-Out Layer:
  lines w5: 960,3605 960,5030 3605,5030 3605,3605 960,3605

## Silkscreen, mask and mechanical layers (free items; w line width, h text height)
Top Overlay:
  drawing of 35 lines, arcs and shapes, not listed
  text "GND" at 2435,4795 h28 r90
  text "3V3" at 2535,4795 h28 r90
  text "Data" at 2330,4770 h28 r90
  text "RST" at 1101,3760 h28 r90
  text "CS" at 1200,3757 h28 r90
  text "SCL" at 1496,3757 h28 r90
  text "GND" at 1595,3757 h28 r90
  text "3V3" at 1693,3757 h28 r90
  text "DC" at 1299,3756 h28 r90
  text "SDA" at 1397.5,3756 h28 r90
  text "SIG" at 1846,3752 h28 r90
  text "GND" at 2051,3752 h28 r90
  text "3V3" at 1955,3750 h28 r90
  text "3V3" at 2864,3748 h28 r90
  text "GND" at 2969,3748 h28 r90
  text "A0" at 3064,3748 h28 r90
  text "BOOT" at 2593,3744 h28 r90
  text "GND" at 2194,3743 h28 r90
  text "TXD" at 2299,3743 h28 r90
  text "RXD" at 2394,3743 h28 r90
  text "REST" at 2494,3743 h28 r90
  text "3V3" at 2694,3743 h28 r90
BOARD_SHAPE:
  lines w5: 960,3605 3605,3605 3605,5030 960,5030 960,3605

## Dimensions
960,5030 to 960,3605 on BOARD_SHAPE
960,3605 to 3605,3620 on BOARD_SHAPE